# Altium PCB iMX6 Rex_V1I1_PCB.PcbDoc (part 8 of 8)
Units mm, origin at the board's own origin, x right, y up, seen from the top; angles counter-clockwise.
Board outline 70 x 40 mm, 12 copper layers (L1, L2, L3, L4, L5 (PWR), L6 (PWR), L7 (PWR), L8 (PWR), L9, L10, L11, L12), stack 1.566 mm thick; 473 components, 409 nets, 2294 pads, 1880 vias.
Unrouted connection lines stored in the file: 7.
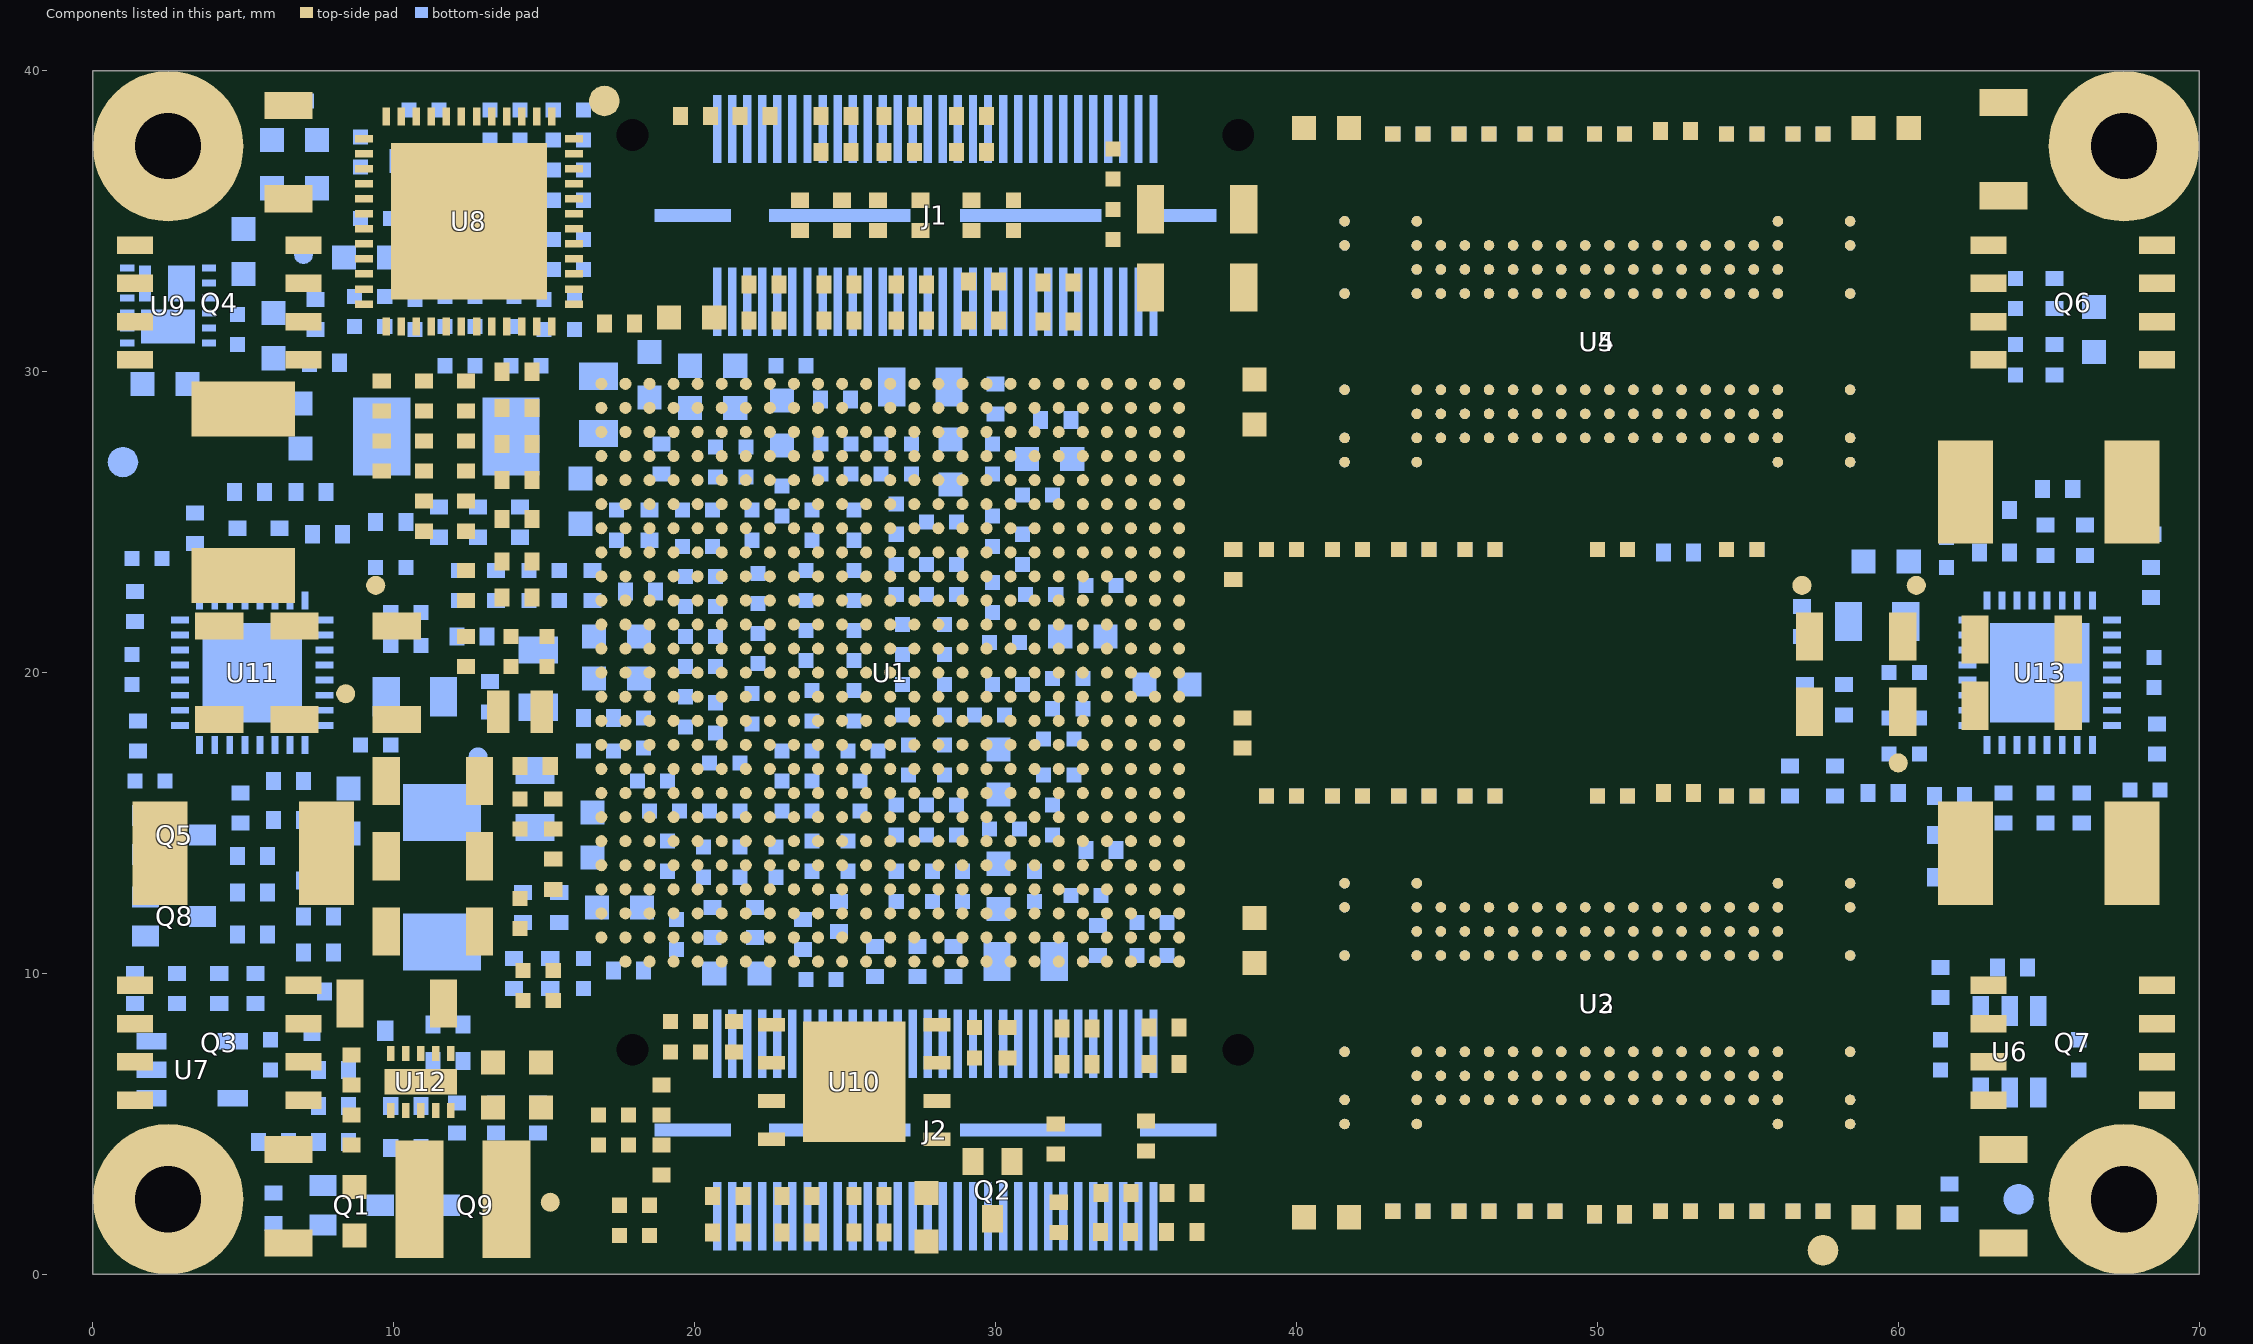
[diagram p18: the components of this part, seen from the top]

## Silkscreen, mask and mechanical layers (free items; w line width, h text height) (continued)
Manufacturing Notes:
  lines w0.2: 101.324,8.28 171.85,8.28 ; 101.324,12.17 171.85,12.17 ; 99.8,-45.65 ccw(c101.05,-45.65) 101.05,-46.9 170.6,-46.9 ccw(c170.6,-45.65) 171.85,-45.65 171.85,16.65 ccw(c170.6,16.65) 170.6,17.9 101.05,17.9 ccw(c101.05,16.65) 99.8,16.65 99.8,-45.65
  lines w0.254: 0,-47.5 80,-47.5 ; 0,-47.425 0,-37.425 ; 0,-27.5 80,-27.5 ; 40,-37.5 40,-27.5 ; 62.5,-27.5 62.5,-20 ; 80,-47.425 80,-37.425 ; 0,-37.5 0,-20 80,-20 80,-37.5 0,-37.5
  text "Board info" at 92.754,120.254 h1.52
  text "Minimum Track: 80um" at 92.754,117.754 h1.52
  text "Minimum Gap: 75um" at 92.754,115.254 h1.52
  text "Minimum Through Hole VIA: 0.45mm (pad) / 0.2mm (drill). Drilling: L1-L12" at 92.754,112.754 h1.52
  text "uVIA: 0.27mm (pad) / 0.1mm (laser drilled hole). Drilling: L1-L2, L2-L3, L10-L11, L11-L12" at 92.754,110.254 h1.52
  text "Buried VIA: 0.45mm (pad) / 0.2mm (drill). Driling: L3-L10" at 92.754,107.754 h1.52
  text "Files" at 0,107.5 h1.52
  text "*.GTO - Top Overlay" at 0,105 h1.52
  text "*.GTP - Top Paste" at 0,102.5 h1.52
  text "1. REMOVE ALL NON-FUNCTIONAL INNER LAYER PADS." at 92.754,100.254 h1.52
  text "*.GTS - Top Solder" at 0,100 h1.52
  text "*.GTL - L1 (Positive)" at 0,97.5 h1.52
  text "2. THIS BOARD CONTAINS IMPEDANCE CONTROLLED TRACKS, TRACK AND GAP SIZES ARE AS FOLLOWS:" at 92.754,95.254 h1.52
  text "*.G1 - L2 (Positive)" at 0,95 h1.52
  text "*.G2 - L3 (Positive)" at 0,92.5 h1.52
  text "TYPE;" at 97.754,90.254 h1.52
  text "Impedance;" at 110.254,90.254 h1.52
  text "Layer (Reference);" at 132.754,90.254 h1.52
  text "Width (um);" at 167.754,90.254 h1.52
  text "Gap (um);" at 187.754,90.254 h1.52
  text "*.GP1 - L4 (Negative)" at 0,90 h1.52
  text "*.G3 - L5 (Positive)" at 0,87.5 h1.52
  text "DIFF;" at 97.754,85.254 h1.52
  text "90ohm;" at 110.254,85.254 h1.52
  text "L1(L2), L12(L11);" at 132.754,85.254 h1.52
  text "101" at 167.754,85.254 h1.52
  text "114" at 187.754,85.254 h1.52
  text "*.G4 - L6 (Positive)" at 0,85 h1.52
  text "DIFF;" at 97.754,82.754 h1.52
  text "90ohm;" at 110.254,82.754 h1.52
  text "L3(L2,L4), L10(L9,L11)" at 132.754,82.754 h1.52
  text "85" at 167.754,82.754 h1.52
  text "115" at 187.754,82.754 h1.52
  text "*.G5 - L7 (Positive)" at 0,82.5 h1.52
  text "*.G6 - L8 (Positive)" at 0,80 h1.52
  text "DIFF;" at 97.754,77.754 h1.52
  text "100ohm;" at 110.254,77.754 h1.52
  text "L1(L2), L12(L11);" at 132.754,77.754 h1.52
  text "90" at 167.754,77.754 h1.52
  text "160" at 187.754,77.754 h1.52
  text "*.GP2 - L9 (Negative)" at 0,77.5 h1.52
  text "DIFF;" at 97.754,75.254 h1.52
  text "100ohm;" at 110.254,75.254 h1.52
  text "L3(L2,L4), L10(L9,L11)" at 132.754,75.254 h1.52
  text "85" at 167.754,75.254 h1.52
  text "195" at 187.754,75.254 h1.52
  text "*.G7 - L10 (Positive)" at 0,75 h1.52
  text "*.G8 - L11 (Positive)" at 0,72.5 h1.52
  text "SE;" at 97.754,70.254 h1.52
  text "55ohm;" at 110.254,70.254 h1.52
  text "L1(L2), L12(L11);" at 132.754,70.254 h1.52
  text "93" at 167.754,70.254 h1.52
  text "*.GBL - L12 (Positive)" at 0,70 h1.52
  text "SE;" at 97.754,67.754 h1.52
  text "55ohm;" at 110.254,67.754 h1.52
  text "L3(L2,L4), L10(L9,L11)" at 132.754,67.754 h1.52
  text "80" at 167.754,67.754 h1.52
  text "*.GBS - Bottom Solder" at 0,67.5 h1.52
  text "*.GBP - Bottom Paste" at 0,65 h1.52
  text "3. FINISHED PANEL THICKNESS IS NOT CRITICAL: TO BE APPROXIMATELY 1.6mm" at 92.754,62.754 h1.52
  text "*.GBO - Bottom Overlay" at 0,62.5 h1.52
  text "*.GM2 - Mechanical Drawing" at 0,60 h1.52
  text "4. BOARD FINISH: IMMERSION Au/ELECTROLESS Ni; 0.05-0.12 um GOLD; 3-6um NICKEL" at 92.754,57.754 h1.52
  text "*.GM3 - Manufacturing Notes" at 0,57.5 h1.52
  text "*.GM4 - Licence" at 0,55 h1.52
  text "5. SOLDER RESIST: APPLY TO BOTH SIDES COLOUR - DARK BLUE" at 92.754,52.754 h1.52
  text "*.GM28 - Board Outline" at 0,52.5 h1.52
  text "6. COMPONENT IDENT: COLOUR TO BE WHITE" at 92.754,47.754 h1.52
  text "7. PANELIZE THE BOARD (2PCS PER PANEL). PLACE FIDUCIALS ON THE PANEL STRIPS AS FOLLOWS:" at 92.754,42.754 h1.52
  text "- FIDUCIAL DIAMTER 1-1.5MM, SOLDER MASK OPENING AT LEAST 1MM GREATER THAN FIDUCIAL" at 97.754,40.254 h1.52
  text "- MINIMUM 4MM DISTANCE FROM THE PANEL EDGE" at 97.754,37.754 h1.52
  text "- 3 FIDUCIALS SHOULD LIE ON TWO LINES THAT INTERSECT AT A RIGHT ANGLE" at 97.754,35.254 h1.52
  text "FOR MASS PRODUCTION" at 8.8,33 h3
  text "- PLACE ONE FIDUCIAL INTO EACH PANEL CORNER (FOUR ON THE TOP AND FOUR ON THE BOTTOM LAYER)" at 97.754,32.754 h1.52
  text "READ THE LICENCE" at 12.7,22.9 h3
  text "Layer Stack Up Detail" at 101.324,13.375 h2.2
  text "CONTACT US AT" at 16.6,12.8 h3
  text "Layer" at 101.324,10.72 h0.9
  text "Gerber" at 126.626,10.72 h0.9
  text "Copper" at 139.941,10.72 h0.9
  text "Dielectric" at 154.727,10.72 h0.9
  text "Name" at 101.324,8.92 h0.9
  text "Document" at 126.626,8.92 h0.9
  text "Thickness" at 139.941,8.92 h0.9
  text "Height" at 154.727,8.92 h0.9
  text "Top Solder Mask" at 101.324,6.386 h1.25
  text "(.GTS)" at 126.626,6.386 h1.25
  text "L1" at 101.324,2.799 h1.25
  text "(.GTL)" at 126.626,2.799 h1.25
  text "0.038mm" at 139.941,2.799 h1.25
  text "robert.feranec@fedevel.com" at -1.5,2.7 h3
  text "0.07mm" at 154.727,1.006 h1.25
  text "L2" at 101.324,-0.788 h1.25
  text "(.G1)" at 126.626,-0.788 h1.25
  text "0.038mm" at 139.941,-0.788 h1.25
  text "0.092mm" at 154.727,-2.581 h1.25
  text "L3" at 101.324,-4.375 h1.25
  text "(.G2)" at 126.626,-4.375 h1.25
  text "0.038mm" at 139.941,-4.375 h1.25
  text "0.2mm" at 154.727,-6.169 h1.25
  text "L4" at 101.324,-7.962 h1.25
  text "(.GP1)" at 126.626,-7.962 h1.25
  text "0.015mm" at 139.941,-7.962 h1.25
  text "0.102mm" at 154.727,-9.756 h1.25
  text "L5" at 101.324,-11.549 h1.25
  text "(.G3)" at 126.626,-11.549 h1.25
  text "0.015mm" at 139.941,-11.549 h1.25
  text "0.1mm" at 154.727,-13.343 h1.25
  text "L6" at 101.324,-15.136 h1.25
  text "(.G4)" at 126.626,-15.136 h1.25
  text "0.015mm" at 139.941,-15.136 h1.25
  text "0.118mm" at 154.727,-16.93 h1.25
  text "L7" at 101.324,-18.724 h1.25
  text "(.G5)" at 126.626,-18.724 h1.25
  text "0.015mm" at 139.941,-18.724 h1.25
  text "0.1mm" at 154.727,-20.517 h1.25
  text "L8" at 101.324,-22.311 h1.25
  text "(.G6)" at 126.626,-22.311 h1.25
  text "0.015mm" at 139.941,-22.311 h1.25
  text "0.102mm" at 154.727,-24.104 h1.25
  text "iMX6 Rex Module" at 5,-25 h3
  text ".VersionRevision" at 65,-25 h3
  text "L9" at 101.324,-25.898 h1.25
  text "(.GP2)" at 126.626,-25.898 h1.25
  text "0.015mm" at 139.941,-25.898 h1.25
  text "0.2mm" at 154.727,-27.691 h1.25
  text "L10" at 101.324,-29.485 h1.25
  text "(.G7)" at 126.626,-29.485 h1.25
  text "0.038mm" at 139.941,-29.485 h1.25
  text "0.093mm" at 154.727,-31.279 h1.25
  text "Copyright FEDEVEL 2013" at 5,-32.5 h1.52
  text "Designed by FEDEVEL" at 45,-32.5 h1.52
  text "L11" at 101.324,-33.072 h1.25
  text "(.G8)" at 126.626,-33.072 h1.25
  text "0.038mm" at 139.941,-33.072 h1.25
  text "0.071mm" at 154.727,-34.866 h1.25
  text "www.fedevel.com" at 45,-35 h1.52
  text "L12" at 101.324,-36.659 h1.25
  text "(.GBL)" at 126.626,-36.659 h1.25
  text "0.038mm" at 139.941,-36.659 h1.25
  text "Bottom Solder Mask" at 101.324,-40.246 h1.25
  text "(.GBS)" at 126.626,-40.246 h1.25
  text "Contact:" at 5,-42.5 h1.52
  text "robert.feranec@fedevel.com" at 5,-45 h1.52
Licence:
  text "LICENCE" at 92.6,124.8 h1.52
  text "ORIGINAL AUTHOR: FEDEVEL 2013" at 92.8,120.3 h1.52
  text "WEBSITE: http://www.iMX6Rex.com" at 92.8,117.8 h1.52
  text "This is a human-readable summary of the Legal Code (read full licence at:" at 92.8,112.8 h1.52
  text "http://creativecommons.org/licenses/by-nc-nd/3.0/deed.en_GB)." at 92.8,110.3 h1.52
  text "You are free:" at 92.8,105.3 h1.52
  text "to copy, distribute, display, and perform the work" at 92.8,102.8 h1.52
  text "Under the following conditions:" at 92.8,97.8 h1.52
  text "Attribution - You must give the original author credit." at 92.8,95.3 h1.52
  text "Non-Commercial - You may not use this work for commercial purposes." at 92.8,92.8 h1.52
  text "No Derivative Works - You may not alter, transform, or build upon this work." at 92.8,90.3 h1.52
  text "With the understanding that:" at 92.8,85.3 h1.52
  text "Waiver - Any of the above conditions can be waived if you get permission from the copyright holder." at 92.8,82.8 h1.52
  text "Public Domain - Where the work or any of its elements is in the public domain under applicable law, that status is in no way affected by the licence." at 92.8,80.3 h1.52
  text "Other Rights - In no way are any of the following rights affected by the licence:" at 92.8,77.8 h1.52
  text "- Your fair dealing or fair use rights, or other applicable copyright exceptions and limitations;" at 92.8,75.3 h1.52
  text "- The author's moral rights;" at 92.8,72.8 h1.52
  text "- Rights other persons may have either in the work itself or in how the work is used, such as publicity or privacy rights." at 92.8,70.3 h1.52
  text "Notice - For any reuse or distribution, you must make clear to others the licence terms of this work." at 92.8,65.3 h1.52
Board Outline:
  the board outline again, w0.2
ASM Top:
  text "Assembly TOP of iMX6 Rex Module" at 8,47.5 h1.52
  text ".VersionRevision" at 56.8,47.5 h1.52
  text ".VariantName" at 25.7,43.6 h1.52
ASM Bottom:
  text ".VersionRevision" at 9.6,47.5 h1.52
  text "Assembly BOTTOM of iMX6 Rex Module" at 62.5,47.4 h1.52
  text ".VariantName" at 41.7,43.6 h1.52

## Dimensions
0,0 to 0,40 on Mechanical Drawing
2.5,2.5 to 0,0 on Mechanical Drawing
2.5,2.5 to 67.5,2.5 on Mechanical Drawing
67.5,37.5 to 72.9,40.7 on Mechanical Drawing
40.065,7.47 to -0.5,2.5 on Mechanical Drawing
40.065,37.87 to 40.065,7.47 on Mechanical Drawing
67.5,37.5 to 67.5,2.5 on Mechanical Drawing
0,0 to 70,0 on Mechanical Drawing
0,0 to 2.5,-0.5 on Mechanical Drawing
17.935,39.1 to 2.5,2.5 on Mechanical Drawing
17.935,37.9 to 38.065,39.07 on Mechanical Drawing
38.065,37.87 to 44.6,43.1 on Mechanical Drawing

## Text inside footprints (layer, text, board x,y; h text height)
Q3: Top Overlay "1" at 5.7,5.6 h1.02 r90
Q4: Top Overlay "1" at 2.7,34.4 h1.02 r270
Q6: Top Overlay "1" at 64.3,34.4 h1.02 r270
Q7: Top Overlay "1" at 67.3,5.6 h1.02 r90